# Altium PCB pcb finale.PcbDoc
Units mm, origin at the board's own origin, x right, y up, seen from the top; angles counter-clockwise.
Board outline 153.67 x 97.41 mm, 2 copper layers (Top Layer, Bottom Layer); 35 components, 31 nets, 85 pads, 0 vias.
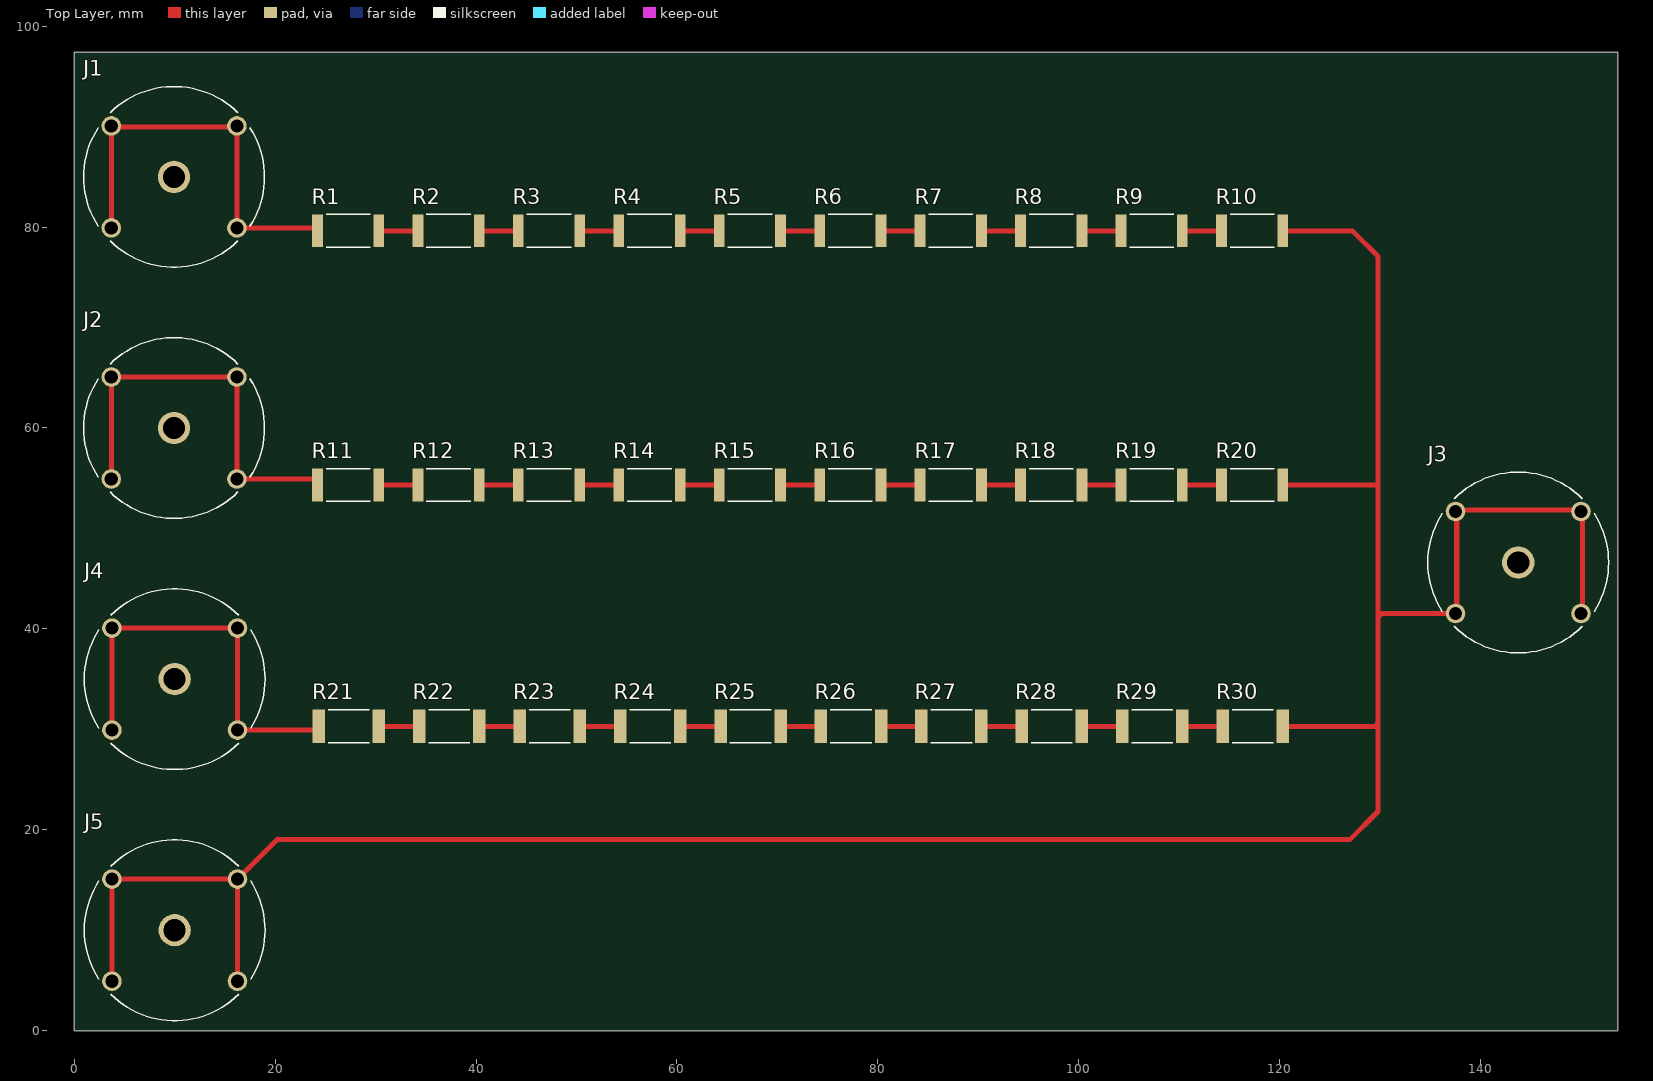
[diagram p0: Top Layer view]
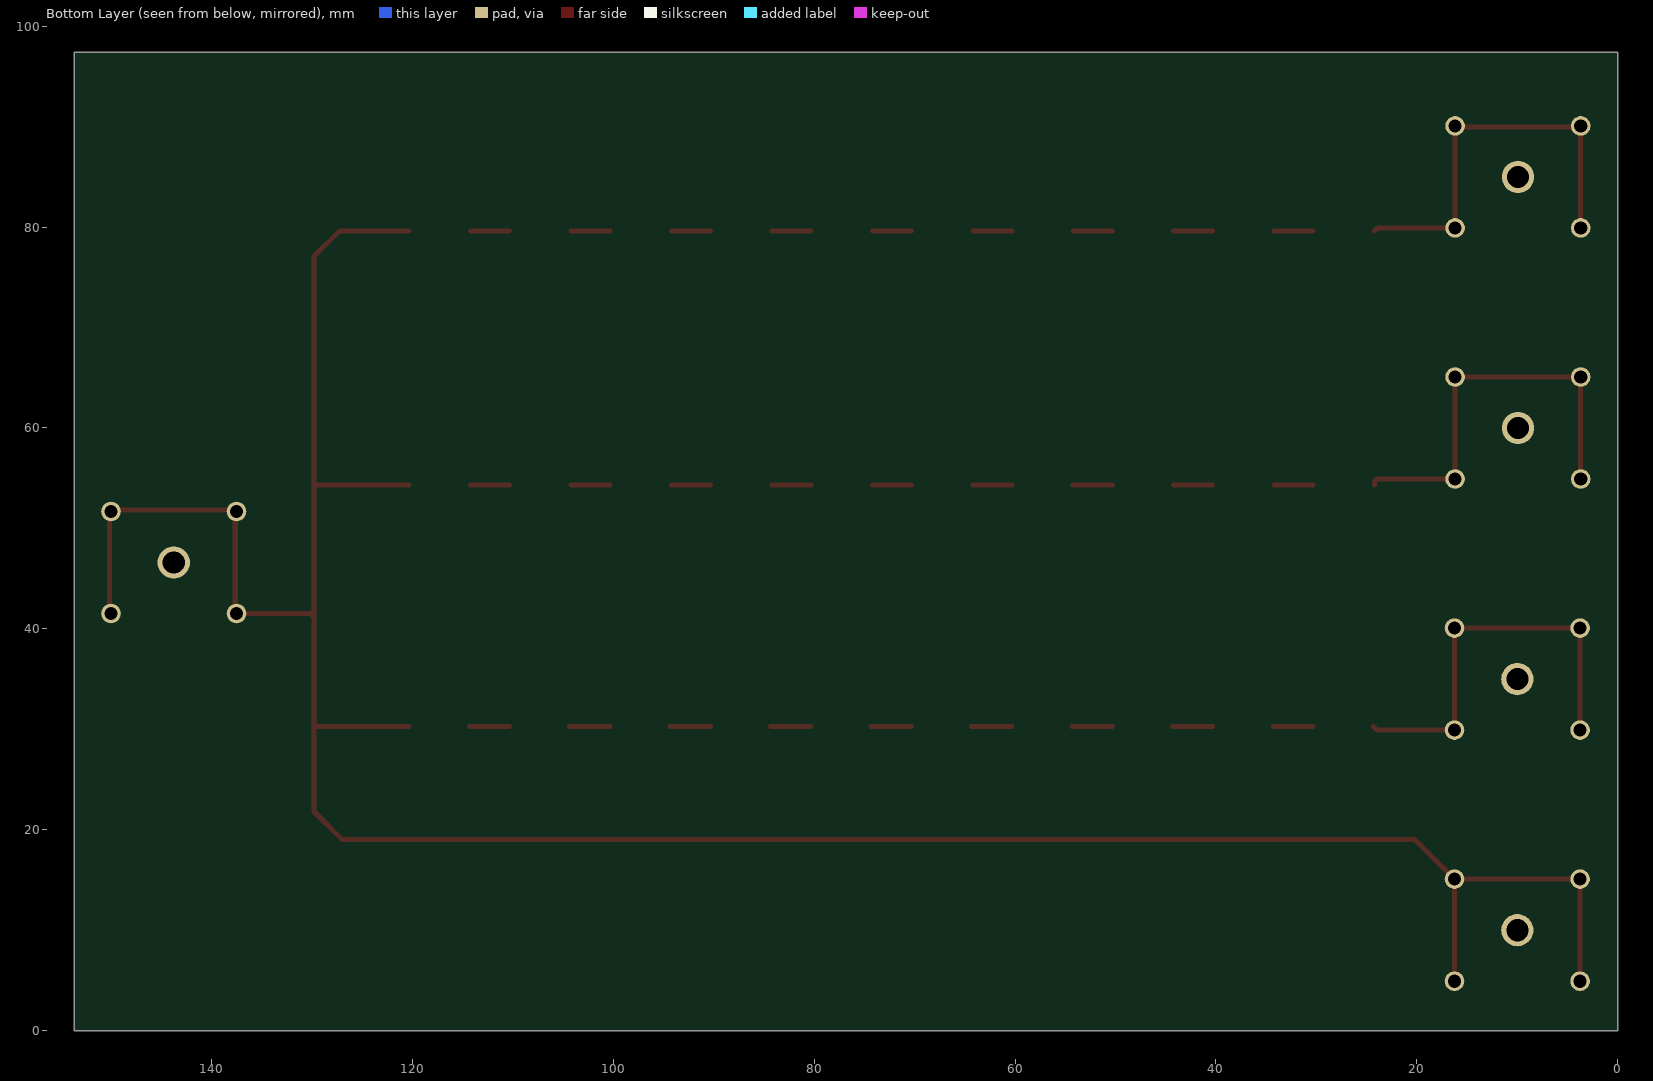
[diagram p1: Bottom Layer view, seen from below]
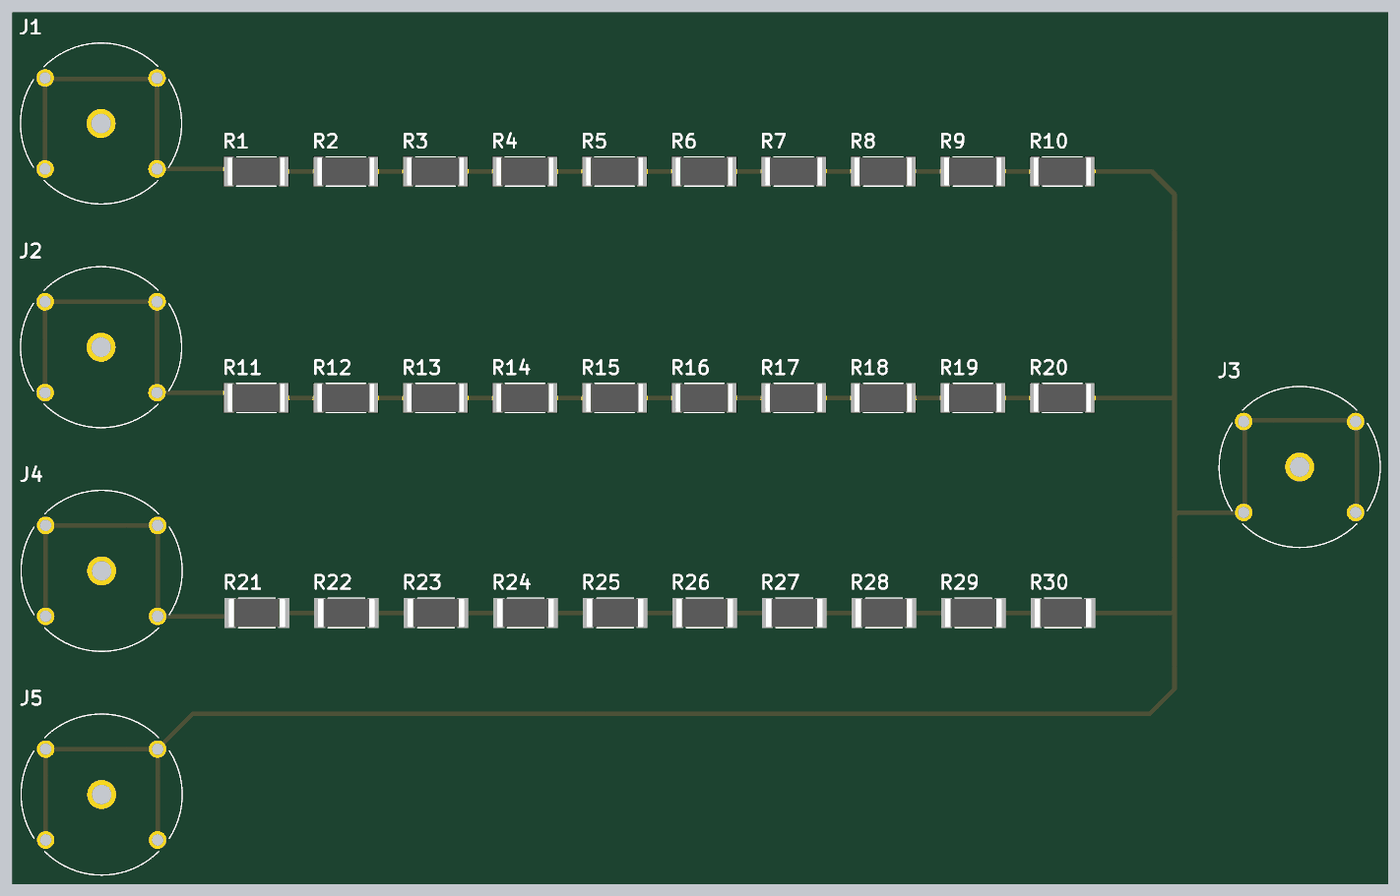
[diagram p2: 3D render of the assembled board from above, using the file's embedded part models]

## Layer stack, top to bottom
Top Solder: solder mask 0.0102, Solder Resist, Dk 3.5
Top Layer: signal copper 0.0356
Dielectric 1: dielectric 0.32, FR-4, Dk 4.8
Bottom Layer: signal copper 0.0356
Bottom Solder: solder mask 0.0102, Solder Resist, Dk 3.5

## Board outline
0,0 153.67,0 153.67,97.409 0,97.409

## Design rules (kind name [scope] priority, off if disabled: settings)
Clearance [All] p1: gap=0.254 ignorepadtopadclearanceinfootprint=FALSE
Height [All] p1: minheight=0 maxheight=30 prefheight=12.7
PolygonConnect [All] p1: connectstyle=Relief reliefconductorwidth=0.254 reliefentries=4 polygonreliefangle="90 Angle" airgapwidth=0.254
RoutingVias [All] p1: holewidth=0.711 width=1.27 viastyle="Through Hole" minholewidth=0.711 minwidth=1.27 maxholewidth=0.711 maxwidth=1.27
SilkToSolderMaskClearance [IsPad] p1: minsilkscreentomaskgap=0.25 clearancetoexposedcopper=TRUE
SolderMaskExpansion [All] p1: expansion=0 istentingtop=FALSE
Width [All] p1: maxlimit=1 minlimit=0.5 preferedwidth=0.5
28 further rules are at their usual default settings.

## Components (designator, comment, footprint, x,y, rotation, side; value= is the part's Value field where it differs from the comment)
J1 "73096-2 (Red)" POMONA_73096-2 9.935,85 r0 top value="PASS HV INPUT"
J2 "73096-2 (Red)" POMONA_73096-2 9.935,60 r0 top value="WARNING HV INPUT"
J3 "73096-0 (Black)" POMONA_73096-2 143.764,46.609 r0 top value="CHASSIS / LV-"
J4 "73096-2 (Red)" POMONA_73096-2 10,35 r0 top value="TECH FAIL HV INPUT"
J5 "73096-2 (Red)" POMONA_73096-2 10,10 r0 top value="HARD SHORT HV INPUT"
R1 "RC2512FK-0727KL" RESC6331X65N 27.268,79.633 r0 top value=27k
R2 "RC2512FK-0727KL" RESC6331X65N 37.268,79.633 r0 top value=27k
R3 "RC2512FK-0727KL" RESC6331X65N 47.268,79.633 r0 top value=27k
R4 "RC2512FK-0727KL" RESC6331X65N 57.268,79.633 r0 top value=27k
R5 "RC2512FK-0727KL" RESC6331X65N 67.268,79.633 r0 top value=27k
R6 "RC2512FK-0727KL" RESC6331X65N 77.268,79.633 r0 top value=27k
R7 "RC2512FK-0727KL" RESC6331X65N 87.268,79.633 r0 top value=27k
R8 "RC2512FK-0727KL" RESC6331X65N 97.268,79.633 r0 top value=27k
R9 "RC2512FK-0727KL" RESC6331X65N 107.268,79.633 r0 top value=27k
R10 "RC2512FK-0727KL" RESC6331X65N 117.268,79.633 r0 top value=27k
R11 "RC2512FK-0747KL" RESC6331X65N 27.268,54.332 r0 top value=47k
R12 "RC2512FK-0747KL" RESC6331X65N 37.268,54.332 r0 top value=47k
R13 "RC2512FK-0747KL" RESC6331X65N 47.268,54.332 r0 top value=47k
R14 "RC2512FK-0747KL" RESC6331X65N 57.268,54.332 r0 top value=47k
R15 "RC2512FK-0747KL" RESC6331X65N 67.268,54.332 r0 top value=47k
R16 "RC2512FK-0747KL" RESC6331X65N 77.268,54.332 r0 top value=47k
R17 "RC2512FK-0747KL" RESC6331X65N 87.268,54.332 r0 top value=47k
R18 "RC2512FK-0747KL" RESC6331X65N 97.268,54.332 r0 top value=47k
R19 "RC2512FK-0747KL" RESC6331X65N 107.268,54.332 r0 top value=47k
R20 "RC2512FK-0747KL" RESC6331X65N 117.268,54.332 r0 top value=47k
R21 "CRCW25126K04FKEG" RESC6331X70N 27.333,30.301 r0 top value=6.04k
R22 "CRCW25126K04FKEG" RESC6331X70N 37.333,30.301 r0 top value=6.04k
R23 "CRCW25126K04FKEG" RESC6331X70N 47.333,30.301 r0 top value=6.04k
R24 "CRCW25126K04FKEG" RESC6331X70N 57.333,30.301 r0 top value=6.04k
R25 "CRCW25126K04FKEG" RESC6331X70N 67.333,30.301 r0 top value=6.04k
R26 "CRCW25126K04FKEG" RESC6331X70N 77.333,30.301 r0 top value=6.04k
R27 "CRCW25126K04FKEG" RESC6331X70N 87.333,30.301 r0 top value=6.04k
R28 "CRCW25126K04FKEG" RESC6331X70N 97.333,30.301 r0 top value=6.04k
R29 "CRCW25126K04FKEG" RESC6331X70N 107.333,30.301 r0 top value=6.04k
R30 "CRCW25126K04FKEG" RESC6331X70N 117.333,30.301 r0 top value=6.04k

## Footprints (in the part's own frame and the unit in brackets; to place one, negate y for a bottom-side part, rotate by r counter-clockwise, add the part's x,y. Pads: shape width x height; smd on the part's side, far side on the other; paste and mask are expansions set on the pad)
POMONA_73096-2 [mm]
  round 3.216 hole 2.2: 1(0,0)
  round 1.95 hole 1.3: SH1(-6.25,5.08) SH2(6.25,5.08) SH3(6.25,-5.08) SH4(-6.25,-5.08)
  silkscreen extent -9,-9 9,9
RESC6331X65N [mm]
  rect 1.07x3.27 smd paste+0 mask+0.102: 1(-3.055,0) 2(3.055,0)
  silkscreen extent -2.2,-1.63 2.2,1.63, body extent -3.18,-1.55 3.17,1.55, height 0.65
RESC6331X70N [mm]
  rect 1.24x3.32 smd: 1(-2.99,0) 2(2.99,0)
  silkscreen extent -2.05,-1.65 2.05,1.65, body extent -3.15,-1.58 3.15,1.58, height 0.7

## Part data
J1 J2 J3 J4 J5: library part 73096-2, Package=None, Availability=Unavailable, MF="{'manufacturer': u'Pomona Electronics'}", MP=73096-2, Price=None
R1 R2 R3 R4 R5 R6 R7 R8 R9 R10: "27 kOhms Â±1% 1W Chip Resistor 2512 (6332 Metric) Moisture Resistant Thick Film", Package="6331 Yageo", Check_prices=https://www.snapeda.com/parts/RC2512FK-0727KL/Yageo/view-part/?ref=eda, MF=Yageo, MP=RC2512FK-0727KL, SnapEDA_Link=https://www.snapeda.com/parts/RC2512FK-0727KL/Yageo/view-part/?ref=snap
R11 R12 R13 R14 R15 R16 R17 R18 R19 R20: "47 kOhms Â±1% 1W Chip Resistor 2512 (6332 Metric) Moisture Resistant Thick Film", Package="6331 Yageo", Check_prices=https://www.snapeda.com/parts/RC2512FK-0747KL/Yageo/view-part/?ref=eda, MF=Yageo, MP=RC2512FK-0747KL, SnapEDA_Link=https://www.snapeda.com/parts/RC2512FK-0747KL/Yageo/view-part/?ref=snap
R21 R22 R23 R24 R25 R26 R27 R28 R29 R30: "6.04 kOhms Â±1% 1W Chip Resistor 2512 (6432 Metric) Automotive AEC-Q200 Thick Film", Package="6331 Vishay", Check_prices=https://www.snapeda.com/parts/CRCW25126K04FKEG/Vishay+Dale/view-part/?ref=eda, MF="Vishay Dale", MP=CRCW25126K04FKEG, SnapEDA_Link=https://www.snapeda.com/parts/CRCW25126K04FKEG/Vishay+Dale/view-part/?ref=snap

## Nets (pads, with @x,y where several pads share a name; then routed paths per layer and width w, separated by ;. In a path a pad name is that pad's centre, name@x,y a point inside that pad or via, vN(x,y) a via of type N, cw(c..) or ccw(c..) an arc to the next point about the centre after c; other vN are vias at no path point)
NetJ1_SH1: J1.SH1 J1.SH2 J1.SH3 J1.SH4 R1.1 | length 41
  Top Layer w0.5: J1.SH4@3.685,79.807 3.685,89.967 16.185,89.967 J1.SH3@16.185,79.807 ; J1.SH3 23.928,79.92 R1.1 R1.1
NetJ2_SH1: J2.SH1 J2.SH2 J2.SH3 J2.SH4 R11.1 | length 41.3
  Top Layer w0.5: J2.SH4 J2.SH1 J2.SH2 J2.SH3 23.928,54.92 24.213,54.635 R11.1
NetJ3_SH1: J3.SH1 J3.SH2 J3.SH3 J3.SH4 J5.SH1 J5.SH2 J5.SH3 J5.SH4 R10.2 R20.2 R30.2 | length 274.6
  Top Layer w0.5: J5.SH4 J5.SH1 J5.SH2 ; J5.SH3 J5.SH2 ; R30.2 129.794,30.301 ; R20.2 129.794,54.332 ; R10.2 127.25,79.633 129.795,77.088 ; 129.719,30.555 129.794,30.48 ; 129.794,76.962 129.794,54.332 ; J3.SH4 130.175,41.529 129.794,41.148 ; J3.SH4@137.641,41.656 137.641,51.816 150.141,51.816 J3.SH3@150.141,41.656 ; J5.SH2 20.186,19.016 127,19.016 129.794,21.81 129.794,30.301 ; 129.794,30.301 129.794,30.48 ; 129.794,30.48 129.794,41.148 ; 129.794,41.148 129.794,54.332
NetJ4_SH1: J4.SH1 J4.SH2 J4.SH3 J4.SH4 R21.1 | length 40.5
  Top Layer w0.5: J4.SH4@3.75,30.475 J4.SH1 J4.SH2 J4.SH3 23.973,29.92 24.343,30.29 R21.1
NetR1_2: R1.2 R2.1 | length 3.9
  Top Layer w0.5: R1.2 R2.1
NetR2_2: R2.2 R3.1 | length 3.9
  Top Layer w0.5: R2.2 R3.1
NetR3_2: R3.2 R4.1 | length 3.9
  Top Layer w0.5: R3.2 R4.1
NetR4_2: R4.2 R5.1 | length 3.9
  Top Layer w0.5: R4.2 R5.1
NetR5_2: R5.2 R6.1 | length 3.9
  Top Layer w0.5: R5.2 R6.1
NetR6_2: R6.2 R7.1 | length 3.9
  Top Layer w0.5: R6.2 R7.1
NetR7_2: R7.2 R8.1 | length 3.9
  Top Layer w0.5: R7.2 R8.1
NetR8_2: R8.2 R9.1 | length 3.9
  Top Layer w0.5: R8.2 R9.1
NetR9_2: R9.2 R10.1 | length 3.9
  Top Layer w0.5: R9.2 R10.1
NetR11_2: R11.2 R12.1 | length 3.9
  Top Layer w0.5: R11.2 R12.1
NetR12_2: R12.2 R13.1 | length 3.9
  Top Layer w0.5: R12.2 R13.1
NetR13_2: R13.2 R14.1 | length 3.9
  Top Layer w0.5: R13.2 R14.1
NetR14_2: R14.2 R15.1 | length 3.9
  Top Layer w0.5: R14.2 R15.1
NetR15_2: R15.2 R16.1 | length 3.9
  Top Layer w0.5: R15.2 R16.1
NetR16_2: R16.2 R17.1 | length 3.9
  Top Layer w0.5: R16.2 R17.1
NetR17_2: R17.2 R18.1 | length 3.9
  Top Layer w0.5: R17.2 R18.1
NetR18_2: R18.2 R19.1 | length 3.9
  Top Layer w0.5: R18.2 R19.1
NetR19_2: R19.2 R20.1 | length 3.9
  Top Layer w0.5: R19.2 R20.1
NetR21_2: R21.2 R22.1 | length 4
  Top Layer w0.5: R21.2 R22.1
NetR22_2: R22.2 R23.1 | length 4
  Top Layer w0.5: R22.2 R23.1
NetR23_2: R23.2 R24.1 | length 4
  Top Layer w0.5: R23.2 R24.1
NetR24_2: R24.2 R25.1 | length 4
  Top Layer w0.5: R24.2 R25.1
NetR25_2: R25.2 R26.1 | length 4
  Top Layer w0.5: R25.2 R26.1
NetR26_2: R26.2 R27.1 | length 4
  Top Layer w0.5: R26.2 R27.1
NetR27_2: R27.2 R28.1 | length 4
  Top Layer w0.5: R27.2 R28.1
NetR28_2: R28.2 R29.1 | length 4
  Top Layer w0.5: R28.2 R29.1
NetR29_2: R29.2 R30.1 | length 4
  Top Layer w0.5: R29.2 R30.1
pads on no net: J1.1 J2.1 J3.1 J4.1 J5.1